# Altium PCB Relay-Driver10A.PcbDoc (part 2 of 3)
Units mil, origin at the board's own origin, x right, y up, seen from the top; angles counter-clockwise.
Board outline 10588 x 8047 mil, 4 copper layers (Top Layer, Layer 1, Layer 2, Bottom Layer), stack 61.653 mil thick; 39 components, 30 nets, 139 pads, 350 vias.
Unrouted connection lines stored in the file: 118.
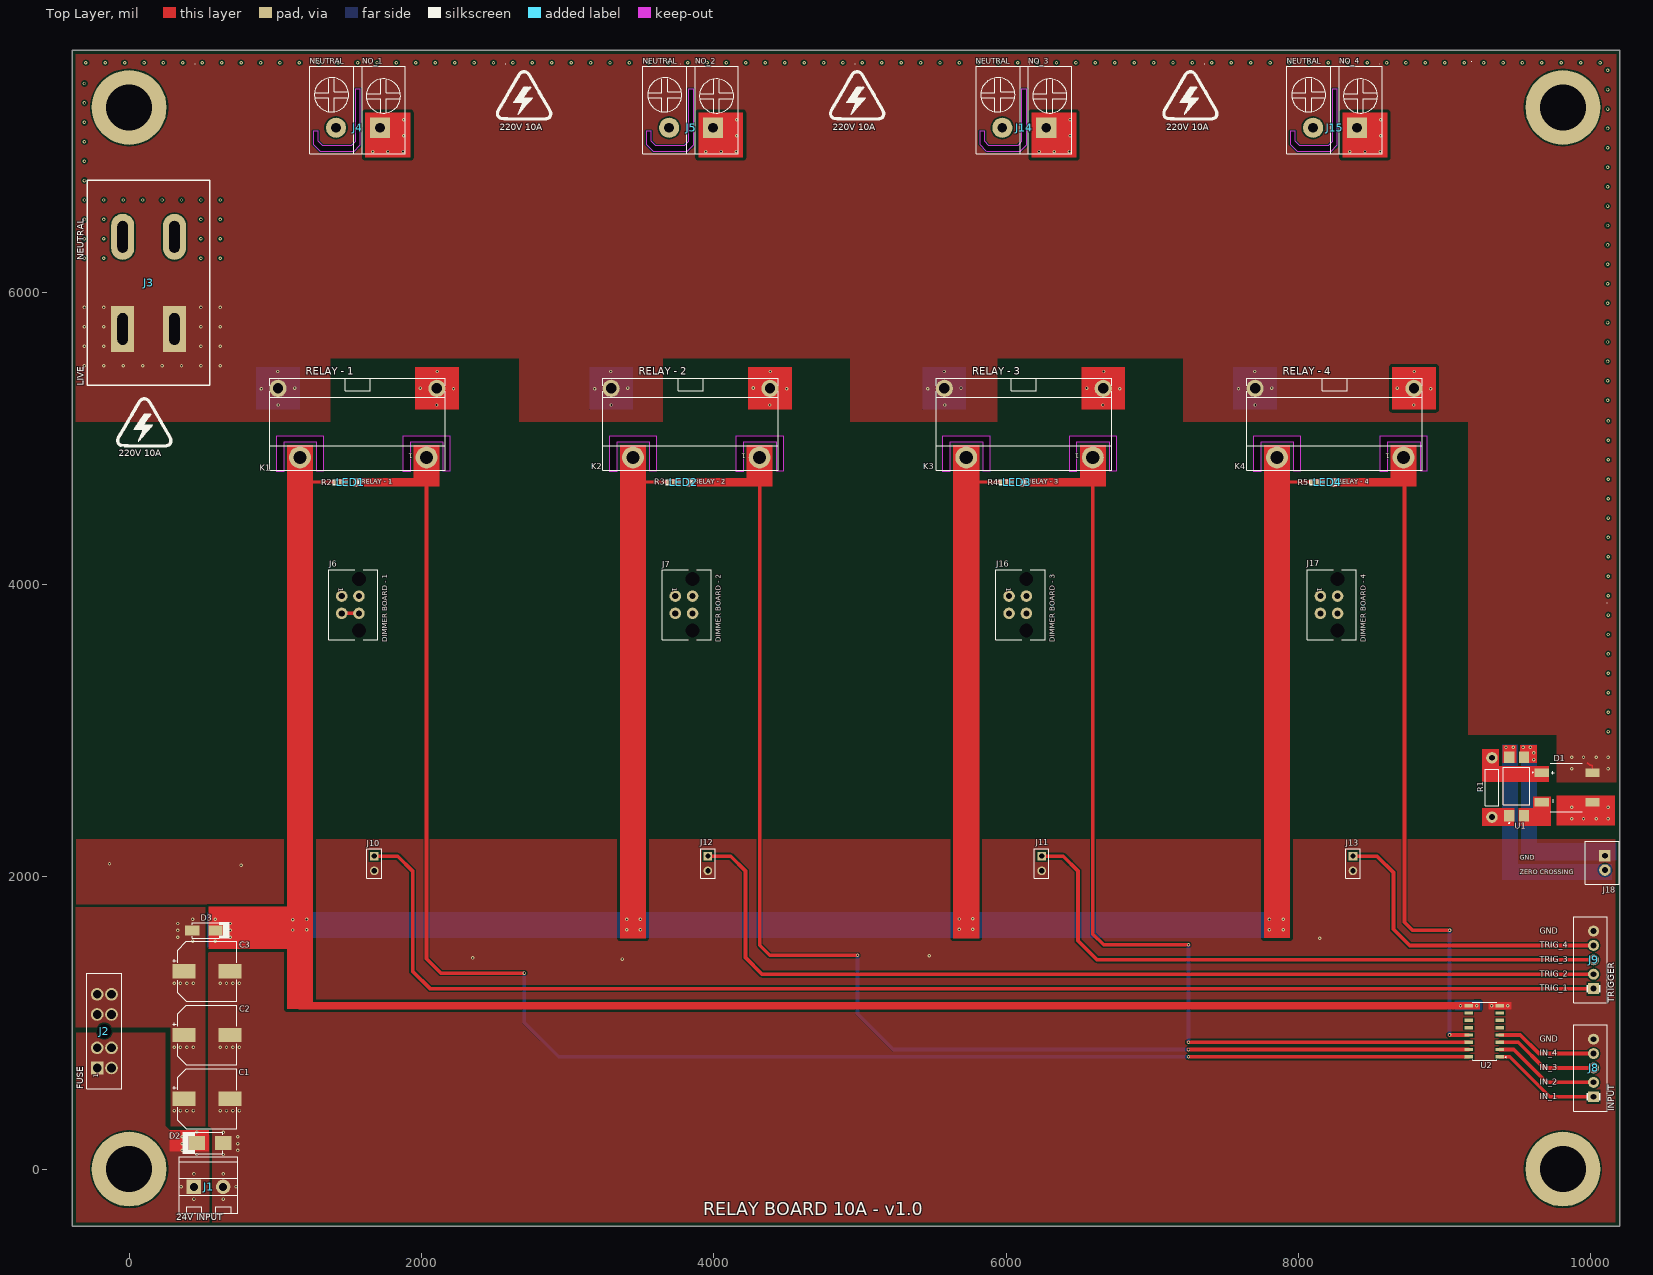
[diagram p0: Top Layer view]

## Other copper (continued)
Bottom Layer: (continued)
  pour cut-out: 3240.28,5047 3658.67,5047 3658.67,4665 3658.67,4652 3242.27,4652 3240.28,4650.01
  pour cut-out: 961.61,5047 1380,5047 1380,4665 1380,4652 963.6,4652 961.61,4650.01
Layer 1 (plane layer: these items are gaps in the copper):
  lines w5: -382,944.34 -381.63,943.97 ; 8045,3575 9271,3575
  lines w30: -385,860.32 -385,1791 ; -385,1767.2 -385,1791 ; 1591,3863 1364,3863 1364,3575 2654,3575 2654,7213 1591,7213 1591,3867 ; 3869.67,3863 3642.67,3863 ; 3869.67,3867 3869.67,7213 4932.67,7213 4932.67,3575 3642.67,3575 ; 6149.33,3863 5922.33,3863 ; 6149.33,3867 6149.33,7213 7212.33,7213 7212.33,3575 5922.33,3575 ; 8275,3863 8048,3863 8048,3575 9338,3575 9338,7213 8275,7213 8275,3867 ; -385,1791 563,1791 563,309 ; 563,309 227,309 227,949.03 -385,949.03 -385,-392 563,-392 563,309 ; 3642.67,3575 3642.67,3863 ; 3642.67,3575 3642.67,3863 ; 5922.33,3575 5922.33,3863 ; 5922.33,3575 5922.33,3863
Layer 2 (plane layer: these items are gaps in the copper):
  lines w40: -390,2262 10198,2262 10198,-392

## Silkscreen, mask and mechanical layers (free items; w line width, h text height)
Top Overlay:
  drawing of 23 lines, arcs and shapes, not listed
  text "NEUTRAL" at 1234,7548.54 h65
  text "NO_1" at 1593.3,7548.54 h65
  text "NEUTRAL" at 3513.27,7548.54 h65
  text "NO_2" at 3871.57,7548.54 h65
  text "NEUTRAL" at 5792.94,7548.54 h65
  text "NO_3" at 6151.24,7548.54 h65
  text "NEUTRAL" at 7918.6,7548.54 h65
  text "NO_4" at 8276.9,7548.54 h65
  text "220V 10A" at 2535.64,7108 h45
  text "220V 10A" at 4814.3,7108 h45
  text "220V 10A" at 7093.97,7108 h45
  text "NEUTRAL" at -294.37,6219.08 h75 r90
  text "RELAY - 1" at 1208.5,5418.36 h85
  text "RELAY - 2" at 3487.17,5418.36 h85
  text "RELAY - 3" at 5766.83,5418.36 h85
  text "RELAY - 4" at 7892.5,5418.36 h85
  text "LIVE" at -294.37,5358 h75 r90
  text "220V 10A" at -69.51,4877 h45
  text "RELAY - 1" at 1587,4674 h55
  text "RELAY - 2" at 3865.63,4674 h55
  text "RELAY - 3" at 6143.31,4674 h55
  text "RELAY - 4" at 8268.63,4674 h55
  text "DIMMER BOARD - 1" at 1779.5,3603 h60 r90
  text "DIMMER BOARD - 2" at 4061.83,3603 h60 r90
  text "DIMMER BOARD - 3" at 6345.16,3603 h60 r90
  text "DIMMER BOARD - 4" at 8474.5,3603 h60 r90
  text "GND" at 9513.86,2103.43 h55
  text "ZERO CROSSING" at 9513.86,2005 h55
  text "GND" at 9651,1598.01 h70
  text "TRIG_4" at 9651,1500.28 h70
  text "TRIG_3" at 9651,1401.85 h70
  text "TRIG_2" at 9651,1303.43 h70
  text "TRIG_1" at 9651,1205 h70
  text "TRIGGER" at 10176.69,1136.85 h75 r90
  text "GND" at 9651,859 h70
  text "IN_4" at 9651,760.58 h70
  text "IN_3" at 9651,662.15 h70
  text "IN_2" at 9651,563.73 h70
  text "FUSE" at -296.77,547.23 h75 r90
  text "IN_1" at 9651,465.3 h70
  text "INPUT" at 10175.88,397.15 h75 r90
  text "RELAY BOARD 10A - v1.0" at 3925.94,-345.01 h150
  text "24V INPUT" at 321.56,-366.03 h75
Bottom Overlay:
  drawing of 16 lines, arcs and shapes, not listed
  text "ZERO CARBON FOOTPRINT" at 9342,-281 h40
  text "24V" at 396.07,-385 h85 r270
  text "GND" at 596.06,-385 h85 r270
Board Outline:
  lines w5: 1009.23,4771.73 1009.23,5015.73 1328.23,5015.73 1328.23,4772.73 1284.23,4772.73 1284.23,4973 1056.23,4973 1056.23,4771.73 1009.23,4771.73 ; 1259.57,7011.47 1303.37,6967.67 1308.37,6962.67 1538.67,6962.67 1582.33,7006.33 1582.33,7386.67 1546,7386.67 1546,7028 1519,7001 1323,7001 1294,7030 1294,7101 1259.57,7101 1259.57,7011.47 ; 1875.37,4771.73 1922.37,4771.73 1922.37,4973 2150.37,4973 2150.37,4772.73 2194.37,4772.73 2194.37,5015.73 1875.37,5015.73 1875.37,4771.73 ; 3287.9,4771.73 3334.9,4771.73 3334.9,4973 3562.9,4973 3562.9,4772.73 3606.9,4772.73 3606.9,5015.73 3287.9,5015.73 3287.9,4771.73 ; 3538.24,7011.47 3582.04,6967.67 3587.04,6962.67 3817.33,6962.67 3861,7006.33 3861,7386.67 3824.67,7386.67 3824.67,7028 3797.67,7001 3601.67,7001 3572.67,7030 3572.67,7101 3538.24,7101 3538.24,7011.47 ; 4154.03,4771.73 4154.03,5015.73 4473.03,5015.73 4473.03,4772.73 4429.03,4772.73 4429.03,4973 4201.03,4973 4201.03,4771.73 4154.03,4771.73 ; 5567.56,4771.73 5614.56,4771.73 5614.56,4973 5842.56,4973 5842.56,4772.73 5886.56,4772.73 5886.56,5015.73 5567.56,5015.73 5567.56,4771.73 ; 5817.9,7011.47 5861.71,6967.67 5866.71,6962.67 6097,6962.67 6140.67,7006.33 6140.67,7386.67 6104.33,7386.67 6104.33,7028 6077.33,7001 5881.33,7001 5852.33,7030 5852.33,7101 5817.9,7101 5817.9,7011.47 ; 6433.7,4771.73 6433.7,5015.73 6752.7,5015.73 6752.7,4772.73 6708.7,4772.73 6708.7,4973 6480.7,4973 6480.7,4771.73 6433.7,4771.73 ; 7693.23,4771.73 7693.23,5015.73 8012.23,5015.73 8012.23,4772.73 7968.23,4772.73 7968.23,4973 7740.23,4973 7740.23,4771.73 7693.23,4771.73 ; 7943.57,7011.47 7943.57,7101 7978,7101 7978,7030 8007,7001 8203,7001 8230,7028 8230,7386.67 8266.33,7386.67 8266.33,7006.33 8222.67,6962.67 7992.37,6962.67 7987.37,6967.67 7943.57,7011.47 ; 8559.37,4771.73 8559.37,5015.73 8878.37,5015.73 8878.37,4772.73 8834.37,4772.73 8834.37,4973 8606.37,4973 8606.37,4771.73 8559.37,4771.73
  lines w10: 3306.67,4755 3368,4693.67 3549.67,4693.67 3549.67,4733 3388.67,4733 3350.67,4771 3350.67,4953 3374.67,4977 3540.67,4977 3540.67,5016.43 3353.1,5016.43 3313.33,4976.67 3306.67,4970 3306.67,4755
  lines w40: -390,-392 10198,-392 10198,7655 -390,7655 -390,-392
Fabrication:
  drawing of 295 lines, arcs and shapes, not listed
  text "Layer" at 10800.2,2813 h60
  text "Name" at 11210.11,2813 h60
  text "Material" at 12139.85,2813 h60
  text "Thickness" at 12999.62,2813 h60
  text "Constant" at 13649.46,2813 h60
  text "Board Layer Stack" at 14219.32,2813 h60
  text "Top Overlay" at 11210.11,2693 h60
  text "Top Solder" at 11210.11,2573 h60
  text "Solder Resist" at 12139.85,2573 h60
  text "0.40mil" at 12999.62,2573 h60
  text "3.5" at 13649.46,2573 h60
  text "1" at 10800.2,2453 h60
  text "Top Layer" at 11210.11,2453 h60
  text "1.38mil" at 12999.62,2453 h60
  text "Dielectric 2" at 11210.11,2333 h60
  text "PP-006" at 12139.85,2333 h60
  text "7.99mil" at 12999.62,2333 h60
  text "4.4" at 13649.46,2333 h60
  text "2" at 10800.2,2213 h60
  text "Layer 1" at 11210.11,2213 h60
  text "CF-004" at 12139.85,2213 h60
  text "1.18mil" at 12999.62,2213 h60
  text "Dielectric 1" at 11210.11,2093 h60
  text "FR-4" at 12139.85,2093 h60
  text "40.55mil" at 12999.62,2093 h60
  text "4.6" at 13649.46,2093 h60
  text "3" at 10800.2,1973 h60
  text "Layer 2" at 11210.11,1973 h60
  text "CF-004" at 12139.85,1973 h60
  text "1.18mil" at 12999.62,1973 h60
  text "Dielectric 3" at 11210.11,1853 h60
  text "PP-006" at 12139.85,1853 h60
  text "7.99mil" at 12999.62,1853 h60
  text "4.4" at 13649.46,1853 h60
  text "4" at 10800.2,1733 h60
  text "Bottom Layer" at 11210.11,1733 h60
  text "1.38mil" at 12999.62,1733 h60
  text "Bottom Solder" at 11210.11,1613 h60
  text "Solder Resist" at 12139.85,1613 h60
  text "0.40mil" at 12999.62,1613 h60
  text "3.5" at 13649.46,1613 h60
  text "Bottom Overlay" at 11210.11,1493 h60
  text "Total board thickness:" at 10800.2,1373 h60
  text "62.45mil" at 12999.62,1373 h60
Drill Drawing:
  circle w10: c10835.07,4516.33 r20
  circle w10: c10835.07,4516.33 r33.33
  circle w10: c10835.07,3916.33 r33.33
  lines w10: 10801.73,3732.99 10801.73,3749.66 10818.4,3766.33 10801.73,3782.99 10801.73,3799.66 10818.4,3799.66 10835.07,3782.99 10851.73,3799.66 10868.4,3799.66 10868.4,3782.99 10851.73,3766.33 10868.4,3749.66 10868.4,3732.99 10851.73,3732.99 10835.07,3749.66 10818.4,3732.99 10801.73,3732.99 ; 10801.73,4032.99 10801.73,4049.66 10818.4,4066.33 10801.73,4082.99 10801.73,4099.66 10818.4,4099.66 10835.07,4082.99 10851.73,4099.66 10868.4,4099.66 10868.4,4082.99 10851.73,4066.33 10868.4,4049.66 10868.4,4032.99 10851.73,4032.99 10835.07,4049.66 10818.4,4032.99 10801.73,4032.99 ; 10801.73,4182.99 10868.4,4182.99 10868.4,4249.66 10801.73,4249.66 10801.73,4182.99 ; 10801.73,4332.99 10835.07,4349.66 10868.4,4332.99 10851.73,4366.33 10868.4,4399.66 10835.07,4382.99 10801.73,4399.66 10818.4,4366.33 10801.73,4332.99 ; 10801.73,4849.66 10868.4,4849.66 10835.07,4782.99 10801.73,4849.66 ; 10801.73,4949.66 10818.4,4949.66 10818.4,4932.99 10851.73,4932.99 10851.73,4949.66 10868.4,4949.66 10868.4,4982.99 10851.73,4982.99 10851.73,4999.66 10818.4,4999.66 10818.4,4982.99 10801.73,4982.99 10801.73,4949.66 ; 10801.73,5116.33 10835.07,5082.99 10868.4,5116.33 10835.07,5149.66 10801.73,5116.33 ; 10801.73,5249.66 10818.4,5249.66 10835.07,5232.99 10851.73,5249.66 10868.4,5249.66 10851.73,5266.33 10868.4,5282.99 10851.73,5282.99 10835.07,5299.66 10818.4,5282.99 10801.73,5282.99 10818.4,5266.33 10801.73,5249.66 ; 10801.73,5382.99 10868.4,5382.99 10868.4,5449.66 10801.73,5449.66 10801.73,5382.99 ; 10801.73,5599.66 10868.4,5599.66 10835.07,5532.99 10801.73,5599.66 ; 10815.07,3746.33 10815.07,3756.33 10825.07,3766.33 10815.07,3776.33 10815.07,3786.33 10825.07,3786.33 10835.07,3776.33 10845.07,3786.33 10855.07,3786.33 10855.07,3776.33 10845.07,3766.33 10855.07,3756.33 10855.07,3746.33 10845.07,3746.33 10835.07,3756.33 10825.07,3746.33 10815.07,3746.33 ; 10815.07,4196.33 10855.07,4196.33 10855.07,4236.33 10815.07,4236.33 10815.07,4196.33 ; 10815.07,5586.33 10855.07,5586.33 10835.07,5546.33 10815.07,5586.33
  lines w15: 10741.94,3687.99 20509.22,3687.99 ; 10741.94,5637.99 20509.22,5637.99 ; 11292.82,3537.99 11292.82,5787.99 ; 11892.66,3537.99 11892.66,5787.99 ; 13042.32,3537.99 13042.32,5787.99 ; 13548.2,3537.99 13548.2,5787.99 ; 14282,3537.99 14282,5787.99 ; 15781.55,3537.99 15781.55,5787.99 ; 16371.4,3537.99 16371.4,5787.99 ; 17117.2,3537.99 17117.2,5787.99 ; 17956.96,3537.99 17956.96,5787.99 ; 19106.62,3537.99 19106.62,5787.99 ; 10741.94,3537.99 20509.22,3537.99 20509.22,5787.99 10741.94,5787.99 10741.94,3537.99
  text "Symbol" at 10831.94,5682.99 h72
  text "Count" at 11337.82,5682.99 h72
  text "Hole Size" at 11937.66,5682.99 h72
  text "Plated" at 13087.32,5682.99 h72
  text "Hole Type" at 13593.2,5682.99 h72
  text "Drill Layer Pair" at 14327,5682.99 h72
  text "Via/Pad" at 15826.55,5682.99 h72
  text "Pad Shape" at 16416.4,5682.99 h72
  text "Template" at 17162.2,5682.99 h72
  text "Hole Length" at 18001.96,5682.99 h72
  text "Routed Path Length" at 19151.62,5682.99 h72
  text "350" at 11337.82,5532.99 h60
  text "11.81mil (0.300mm)" at 11937.66,5532.99 h60
  text "PTH" at 13087.32,5532.99 h60
  text "Round" at 13593.2,5532.99 h60
  text "Top Layer - Bottom Layer" at 14327,5532.99 h60
  text "Via" at 15826.55,5532.99 h60
  text "Rounded" at 16416.4,5532.99 h60
  text "(Mixed)" at 17162.2,5532.99 h60
  text "-" at 18001.96,5532.99 h60
  text "-" at 19151.62,5532.99 h60
  text "8" at 11337.82,5382.99 h60
  text "35.43mil (0.900mm)" at 11937.66,5382.99 h60
  text "PTH" at 13087.32,5382.99 h60
  text "Round" at 13593.2,5382.99 h60
  text "Top Layer - Bottom Layer" at 14327,5382.99 h60
  text "Pad" at 15826.55,5382.99 h60
  text "(Mixed)" at 16416.4,5382.99 h60
  text "(Mixed)" at 17162.2,5382.99 h60
  text "-" at 18001.96,5382.99 h60
  text "-" at 19151.62,5382.99 h60
  text "14" at 11337.82,5232.99 h60
  text "39.37mil (1.000mm)" at 11937.66,5232.99 h60
  text "PTH" at 13087.32,5232.99 h60
  text "Round" at 13593.2,5232.99 h60
  text "Top Layer - Bottom Layer" at 14327,5232.99 h60
  text "Pad" at 15826.55,5232.99 h60
  text "(Mixed)" at 16416.4,5232.99 h60
  text "(Mixed)" at 17162.2,5232.99 h60
  text "-" at 18001.96,5232.99 h60
  text "-" at 19151.62,5232.99 h60
  text "16" at 11337.82,5082.99 h60
  text "42.00mil (1.067mm)" at 11937.66,5082.99 h60
  text "PTH" at 13087.32,5082.99 h60
  text "Round" at 13593.2,5082.99 h60
  text "Top Layer - Bottom Layer" at 14327,5082.99 h60
  text "Pad" at 15826.55,5082.99 h60
  text "Rounded" at 16416.4,5082.99 h60
  text "c200h107" at 17162.2,5082.99 h60
  text "-" at 18001.96,5082.99 h60
  text "-" at 19151.62,5082.99 h60
  text "2" at 11337.82,4932.99 h60
  text "55.12mil (1.400mm)" at 11937.66,4932.99 h60
  text "PTH" at 13087.32,4932.99 h60
  text "Round" at 13593.2,4932.99 h60
  text "Top Layer - Bottom Layer" at 14327,4932.99 h60
  text "Pad" at 15826.55,4932.99 h60
  text "(Mixed)" at 16416.4,4932.99 h60
  text "(Mixed)" at 17162.2,4932.99 h60
  text "-" at 18001.96,4932.99 h60
  text "-" at 19151.62,4932.99 h60
  text "8" at 11337.82,4782.99 h60
  text "59.06mil (1.500mm)" at 11937.66,4782.99 h60
  text "PTH" at 13087.32,4782.99 h60
  text "Round" at 13593.2,4782.99 h60
  text "Top Layer - Bottom Layer" at 14327,4782.99 h60
  text "Pad" at 15826.55,4782.99 h60
  text "(Mixed)" at 16416.4,4782.99 h60
  text "(Mixed)" at 17162.2,4782.99 h60
  text "-" at 18001.96,4782.99 h60
  text "-" at 19151.62,4782.99 h60
  text "8" at 11337.82,4632.99 h60
  text "66.93mil (1.700mm)" at 11937.66,4632.99 h60
  text "PTH" at 13087.32,4632.99 h60
  text "Round" at 13593.2,4632.99 h60
  text "Top Layer - Bottom Layer" at 14327,4632.99 h60
  text "Pad" at 15826.55,4632.99 h60
  text "(Mixed)" at 16416.4,4632.99 h60
  text "(Mixed)" at 17162.2,4632.99 h60
  text "-" at 18001.96,4632.99 h60
  text "-" at 19151.62,4632.99 h60
  text "G" at 10802.85,4623 h66.67
  text "8" at 11337.82,4482.99 h60
  text "70.87mil (1.800mm)" at 11937.66,4482.99 h60
  text "PTH" at 13087.32,4482.99 h60
  text "Round" at 13593.2,4482.99 h60
  text "Top Layer - Bottom Layer" at 14327,4482.99 h60
  text "Pad" at 15826.55,4482.99 h60
  text "Rounded" at 16416.4,4482.99 h60
  text "(Mixed)" at 17162.2,4482.99 h60
  text "-" at 18001.96,4482.99 h60
  text "-" at 19151.62,4482.99 h60
  text "4" at 11337.82,4332.99 h60
  text "70.87mil (1.800mm)" at 11937.66,4332.99 h60
  text "PTH" at 13087.32,4332.99 h60
  text "Slot" at 13593.2,4332.99 h60
  text "Top Layer - Bottom Layer" at 14327,4332.99 h60
  text "Pad" at 15826.55,4332.99 h60
  text "(Mixed)" at 16416.4,4332.99 h60
  text "(Mixed)" at 17162.2,4332.99 h60
  text "216.54mil (5.500mm)" at 18001.96,4332.99 h60
  text "145.67mil (3.700mm)" at 19151.62,4332.99 h60
  text "8" at 11337.82,4182.99 h60
  text "90.55mil (2.300mm)" at 11937.66,4182.99 h60
  text "PTH" at 13087.32,4182.99 h60
  text "Round" at 13593.2,4182.99 h60
  text "Top Layer - Bottom Layer" at 14327,4182.99 h60
  text "Pad" at 15826.55,4182.99 h60
  text "Rounded" at 16416.4,4182.99 h60
  text "(Mixed)" at 17162.2,4182.99 h60
  text "-" at 18001.96,4182.99 h60
  text "-" at 19151.62,4182.99 h60
  text "8" at 11337.82,4032.99 h60
  text "94.49mil (2.400mm)" at 11937.66,4032.99 h60
  text "NPTH" at 13087.32,4032.99 h60
  text "Round" at 13593.2,4032.99 h60
  text "Top Layer - Bottom Layer" at 14327,4032.99 h60
  text "Pad" at 15826.55,4032.99 h60
  text "Rounded" at 16416.4,4032.99 h60
  text "c0hn240m-1p-1" at 17162.2,4032.99 h60
  text "-" at 18001.96,4032.99 h60
  text "-" at 19151.62,4032.99 h60
  text "1" at 11337.82,3882.99 h60
  text "98.43mil (2.500mm)" at 11937.66,3882.99 h60
  text "NPTH" at 13087.32,3882.99 h60
  text "Round" at 13593.2,3882.99 h60
  text "Top Layer - Bottom Layer" at 14327,3882.99 h60
  text "Pad" at 15826.55,3882.99 h60
  text "Rounded" at 16416.4,3882.99 h60
  text "c0hn250p0" at 17162.2,3882.99 h60
  text "-" at 18001.96,3882.99 h60
  text "-" at 19151.62,3882.99 h60
  text "4" at 11337.82,3732.99 h60
  text "314.96mil (8.000mm)" at 11937.66,3732.99 h60
  text "PTH" at 13087.32,3732.99 h60
  text "Round" at 13593.2,3732.99 h60
  text "Top Layer - Bottom Layer" at 14327,3732.99 h60
  text "Pad" at 15826.55,3732.99 h60
  text "Rounded" at 16416.4,3732.99 h60
  text "c1300h800" at 17162.2,3732.99 h60
  text "-" at 18001.96,3732.99 h60
  text "-" at 19151.62,3732.99 h60
  text "439 Total" at 11337.82,3582.99 h60
  text "Slot definitions :" at 10831.94,3438.02 h60
  text "Routed Path Length" at 11864.63,3438.02 h60
  text "= Calculated from tool start centre position to tool end centre position." at 12967.3,3438.02 h60
  text "Hole Length" at 11864.63,3338.05 h60
  text "= Routed Path Length + Tool Size = Slot length as defined in the PCB layout" at 12557.43,3338.05 h60

## Dimensions
-390,7655 to -385,-392 on Dimension